# Altium PCB PCB2.pcbdoc (part 1 of 3)
Units mil, origin at the board's own origin, x right, y up, seen from the top; angles counter-clockwise.
Board outline 1771.65 x 2755.61 mil, 4 copper layers (Top Layer, Inner1, Inner2, Bottom Layer), stack 62.447 mil thick; 80 components, 88 nets, 409 pads, 183 vias.
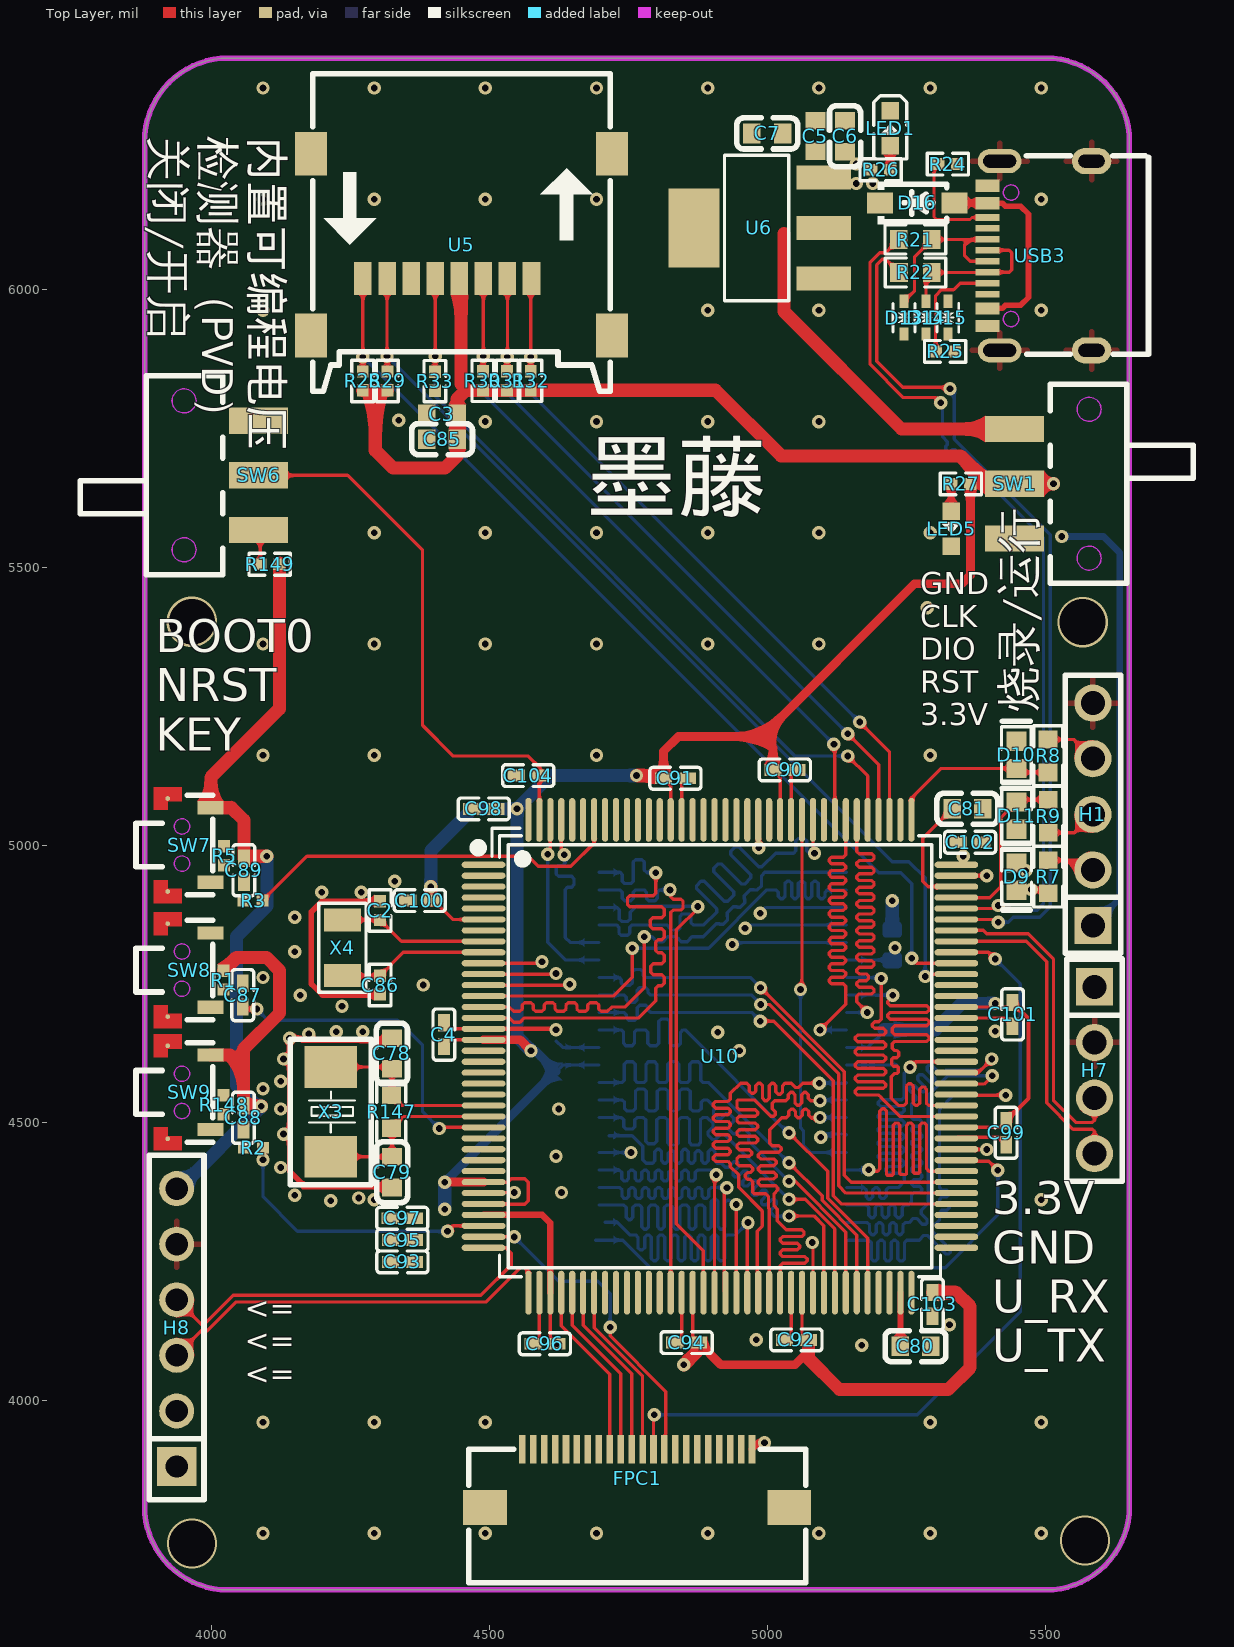
[diagram p0: Top Layer view]
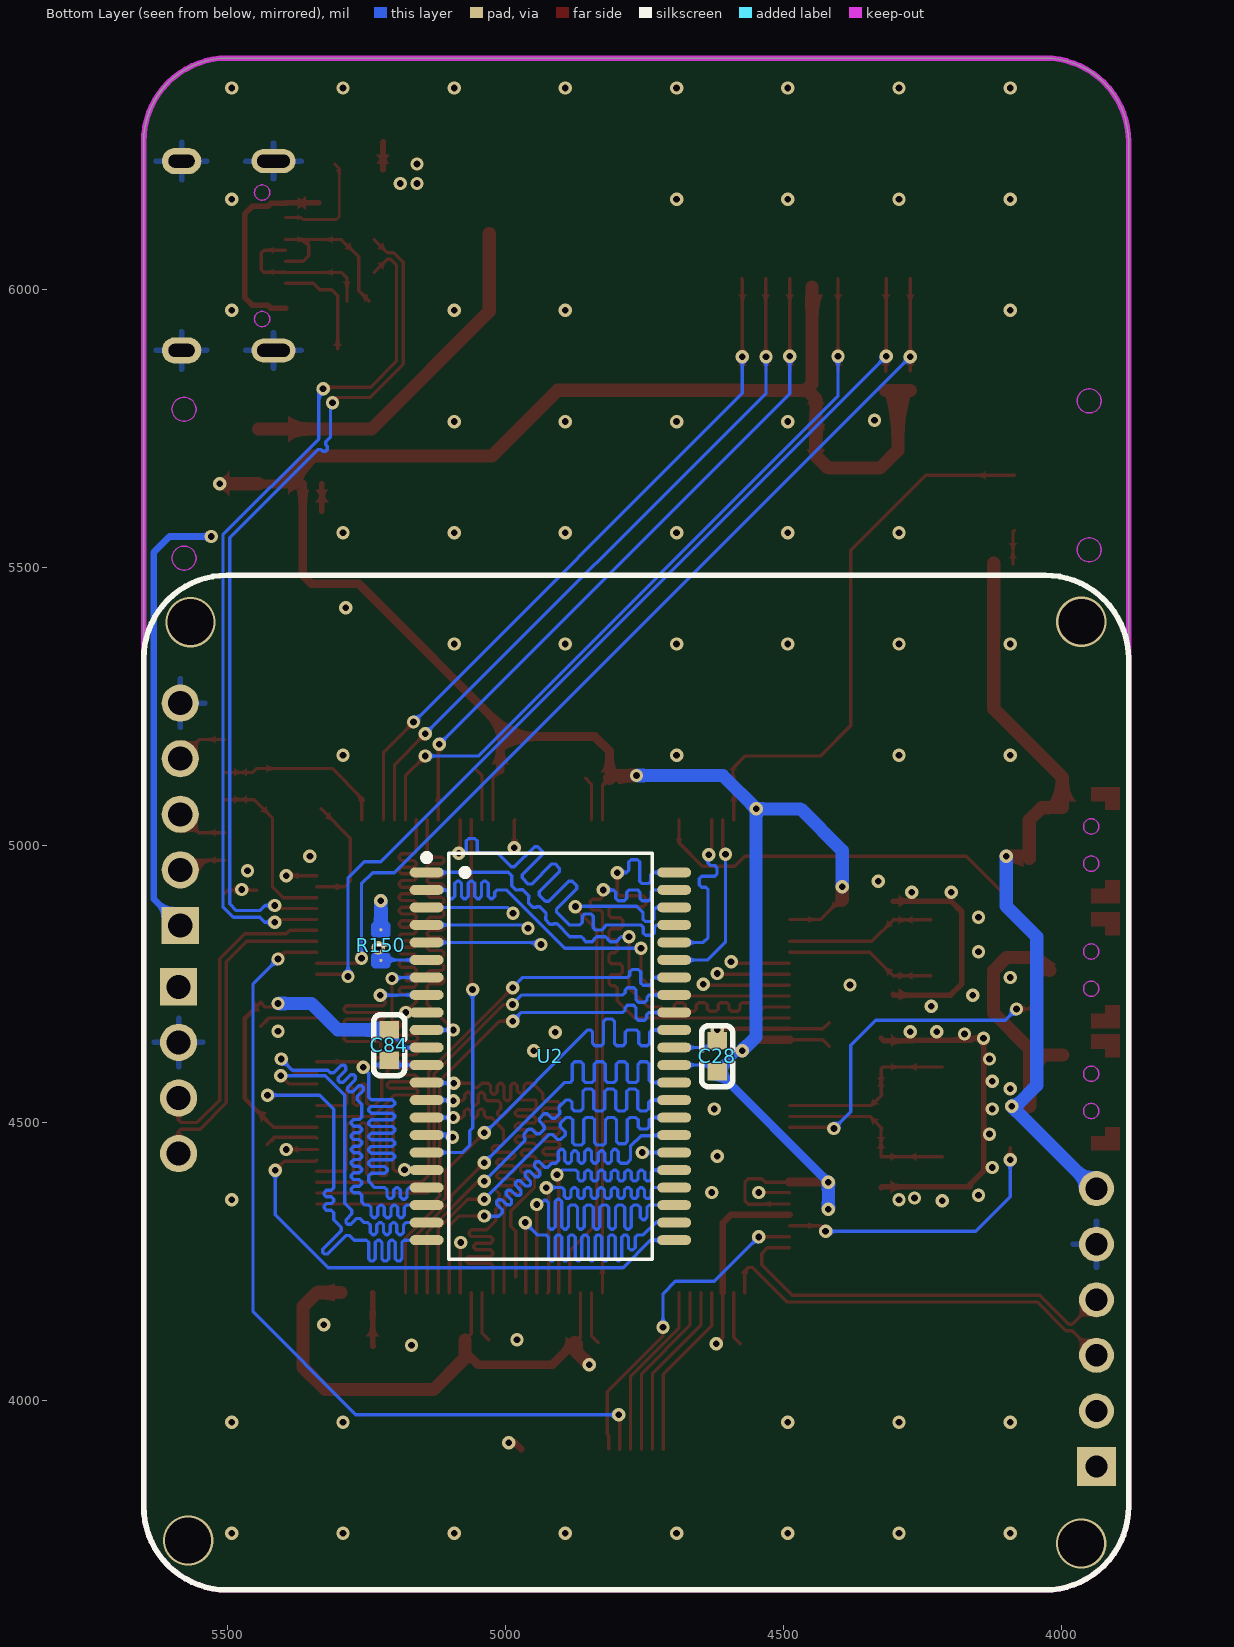
[diagram p1: Bottom Layer view, seen from below]
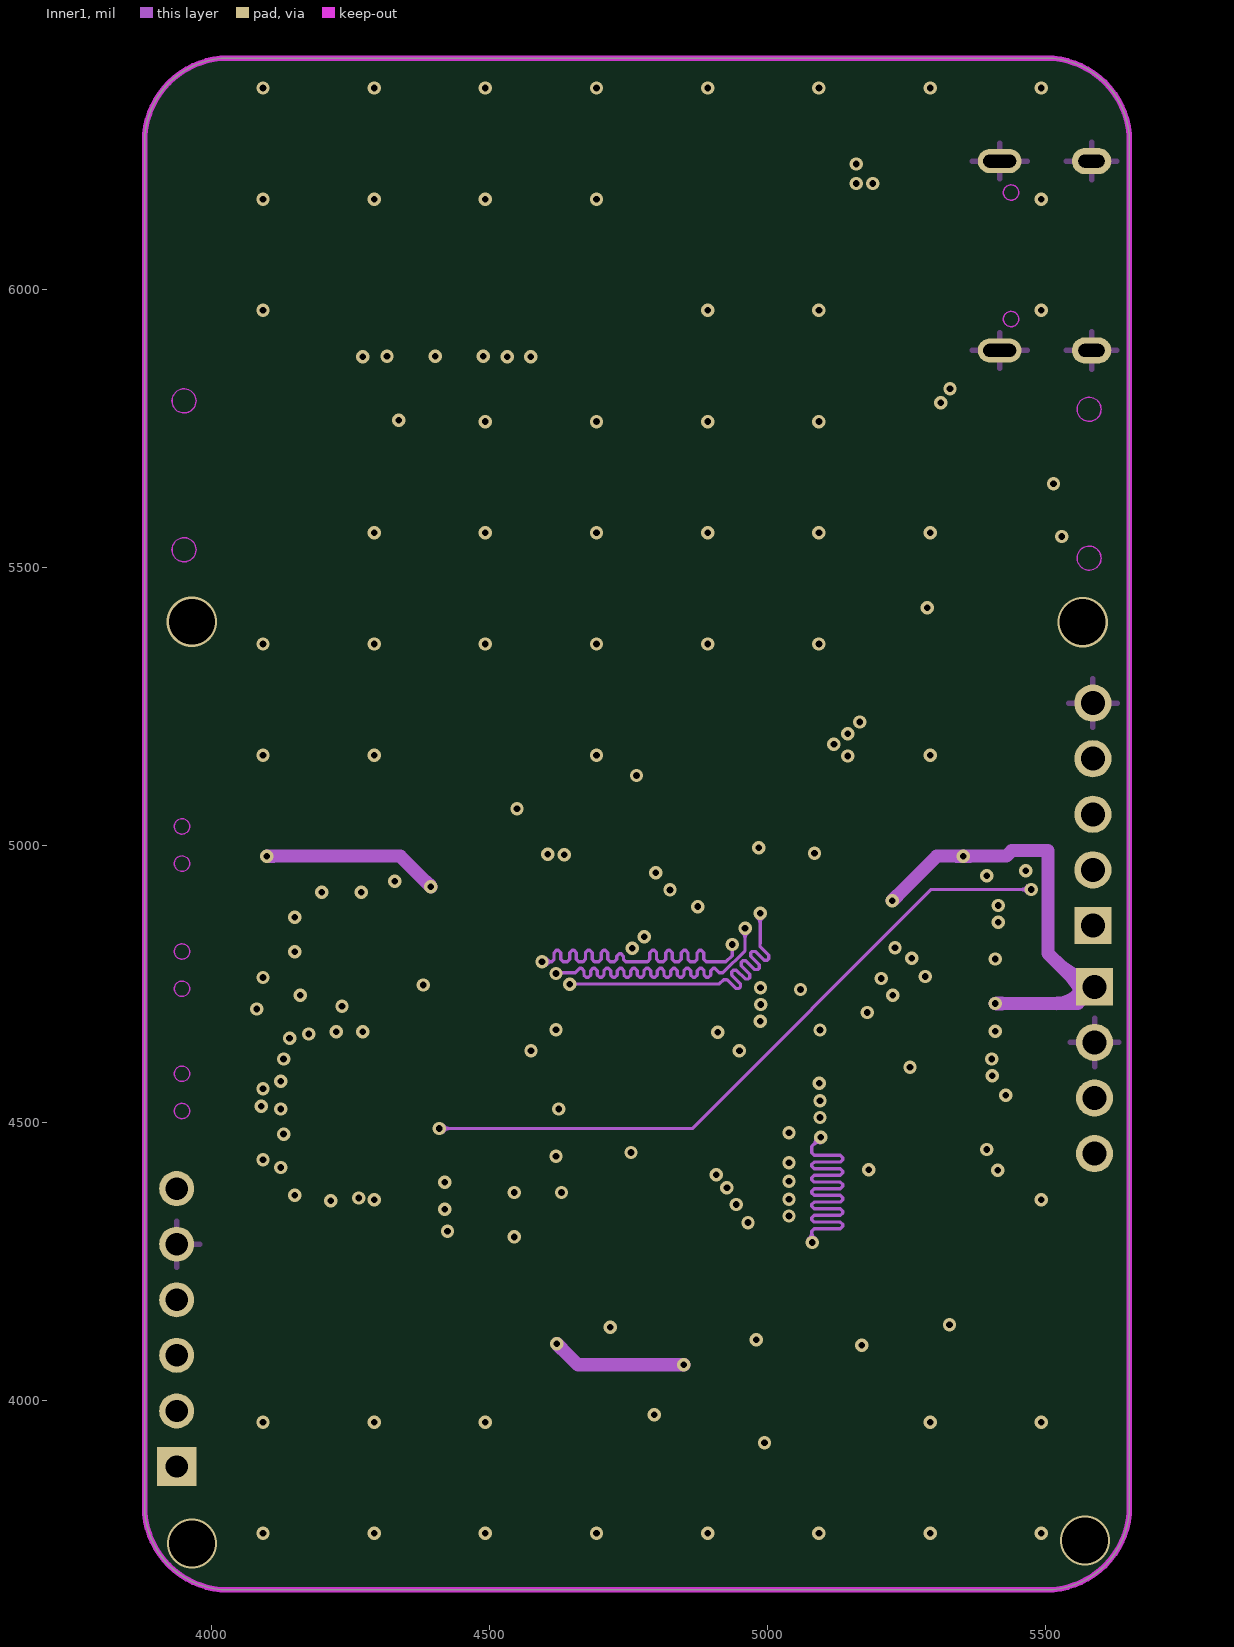
[diagram p2: Inner1]
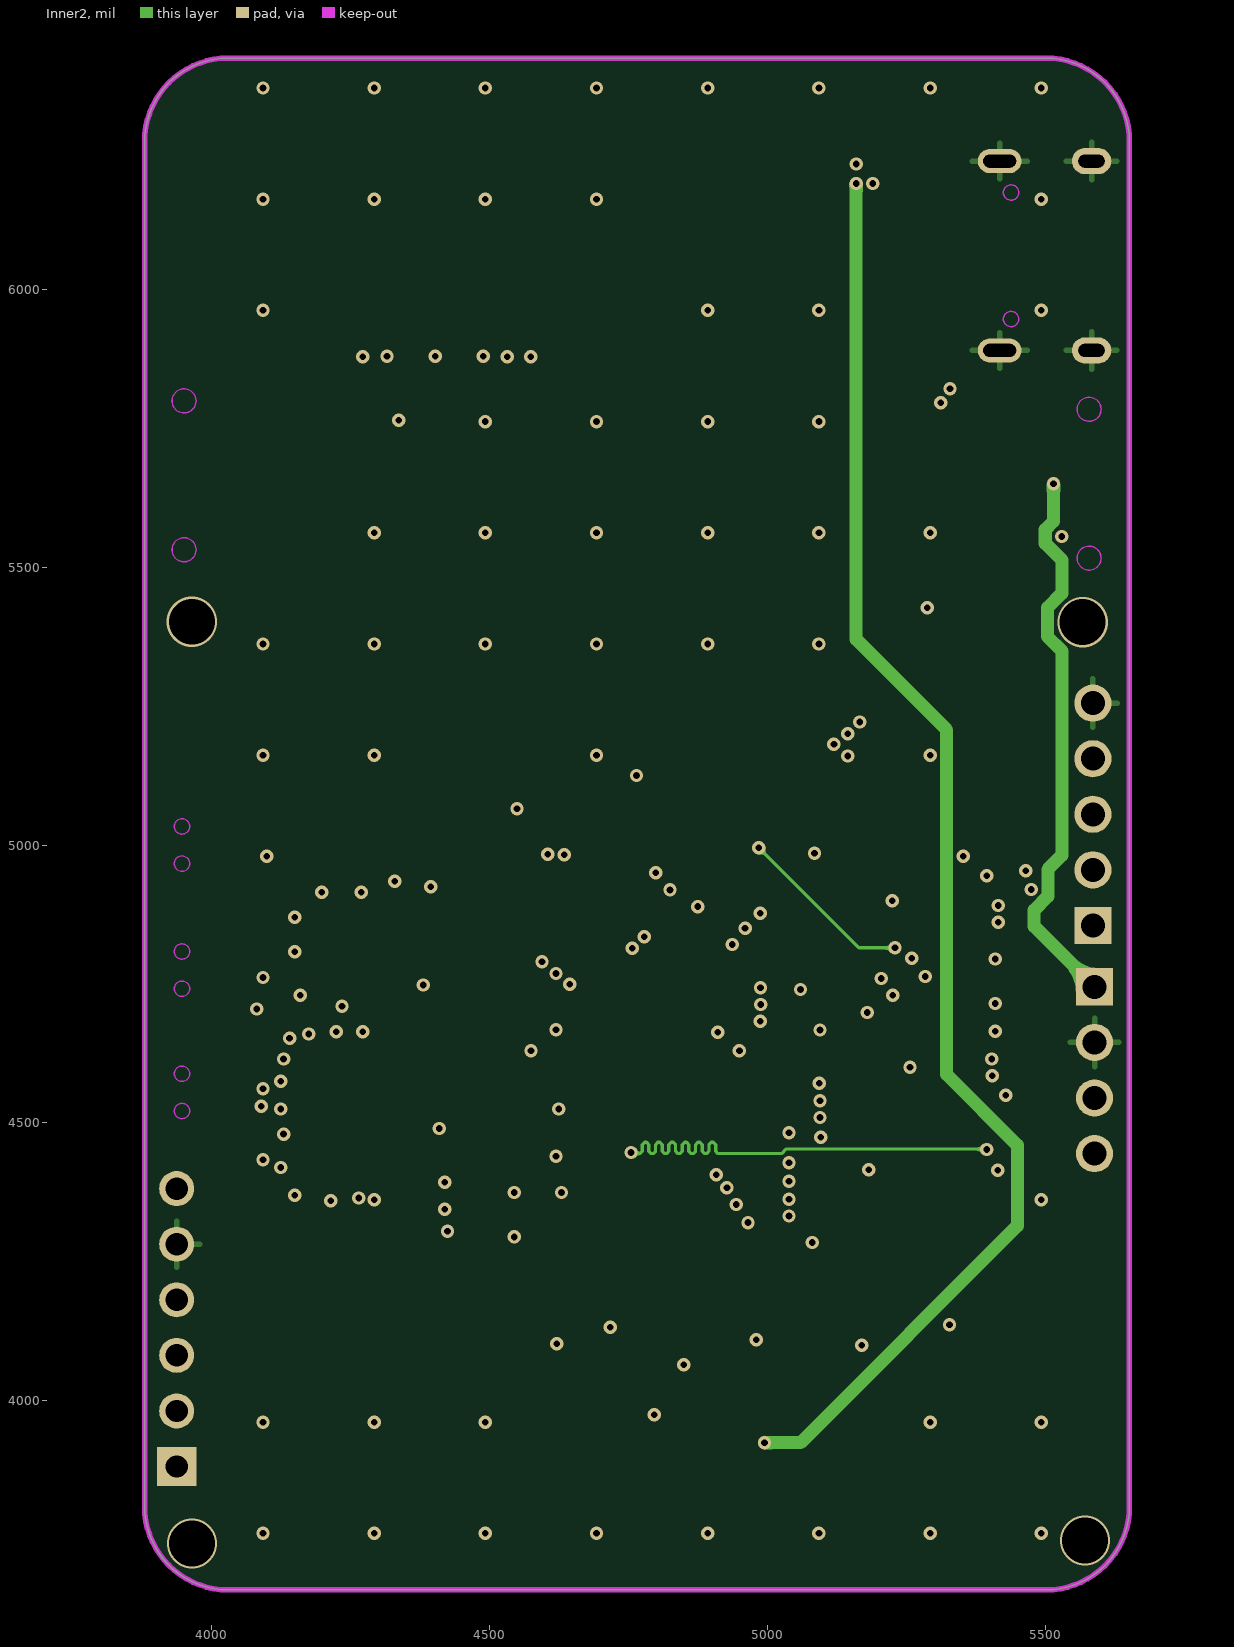
[diagram p3: Inner2]

## Layer stack, top to bottom
Top Layer: signal copper 1.378
Dielectric1: surface 8.283, 7628 RC49% 8.6mil, Dk 0
Inner1: signal copper 0.598
Dielectric2: surface 41.929, 1.1mm H/HOZ Copper, Dk 0
Inner2: signal copper 0.598
Dielectric3: surface 8.283, 7628 RC49% 8.6mil, Dk 0
Bottom Layer: signal copper 1.378

## Board outline
4030,3660 5501.65,3660 ccw(c5501.65,3810) 5651.65,3810 5651.65,6265.61 ccw(c5501.65,6265.61) 5501.65,6415.61 4030,6415.61 ccw(c4030,6265.61) 3880,6265.61 3880,3810 ccw(c4030,3810)

## Design rules (kind name [scope] priority, off if disabled: settings)
BoardOutlineClearance copperThickness1oz [All] p0: genericclearance=10 ignorepadtopadclearanceinfootprint=FALSE except(0: Arc-SplitContinuation Track-SplitContinuation SMDPad-SplitContinuation THPad-SplitContinuation Via-SplitContinuation Fill-SplitContinuation Poly-SplitContinuation Region-SplitContinuation Text-SplitContinuation)
BoardOutlineClearance copperThickness2oz [All] p0: genericclearance=10 ignorepadtopadclearanceinfootprint=FALSE except(0: Arc-SplitContinuation Track-SplitContinuation SMDPad-SplitContinuation THPad-SplitContinuation Via-SplitContinuation Fill-SplitContinuation Poly-SplitContinuation Region-SplitContinuation Text-SplitContinuation)
BoardOutlineClearance Plane_innerPlane [All] p0: genericclearance=10 ignorepadtopadclearanceinfootprint=FALSE except(0: Arc-SplitContinuation Track-SplitContinuation SMDPad-SplitContinuation THPad-SplitContinuation Via-SplitContinuation Fill-SplitContinuation Poly-SplitContinuation Region-SplitContinuation Text-SplitContinuation)
BoardOutlineClearance Copper_copperRegion [All] p0: genericclearance=10 ignorepadtopadclearanceinfootprint=FALSE except(0: Arc-SplitContinuation Track-SplitContinuation SMDPad-SplitContinuation THPad-SplitContinuation Via-SplitContinuation Fill-SplitContinuation Poly-SplitContinuation Region-SplitContinuation Text-SplitContinuation)
BoardOutlineClearance otherClearance [All] p0: genericclearance=10 ignorepadtopadclearanceinfootprint=FALSE except(0: Arc-SplitContinuation Track-SplitContinuation SMDPad-SplitContinuation THPad-SplitContinuation Via-SplitContinuation Fill-SplitContinuation Poly-SplitContinuation Region-SplitContinuation Text-SplitContinuation)
Clearance copperThickness1oz [All] p1: gap=7 ignorepadtopadclearanceinfootprint=FALSE
Clearance copperThickness2oz [All] p1: gap=7 ignorepadtopadclearanceinfootprint=FALSE
Clearance Plane_innerPlane [All] p1: gap=7 ignorepadtopadclearanceinfootprint=FALSE
Clearance Copper_copperRegion [All] p1: gap=7 ignorepadtopadclearanceinfootprint=FALSE
Clearance otherClearance [All] p1: gap=7 ignorepadtopadclearanceinfootprint=FALSE
DiffPairsRouting differentialPair [All] p1: maxuncoupledlength=10 minlimit=6 maxlimit=Infinity mostfreqgap=6 toplayer_minwidth=5 toplayer_prefwidth=10 toplayer_maxwidth=100 bottomlayer_minwidth=5 bottomlayer_prefwidth=10 bottomlayer_maxwidth=100 midlayer1_minwidth=5 midlayer1_prefwidth=10 midlayer1_maxwidth=100 midlayer2_minwidth=5 midlayer2_prefwidth=10 midlayer2_maxwidth=100
PasteMaskExpansion pasteMaskExpansion [All] p1: expansion=0
PlaneConnect innerPlane [All] p1: planeconnectstyle=Relief reliefexpansion=20 reliefentries=4 reliefconductorwidth=10 reliefairgap=10
PolygonConnect copperRegion [All] p1: connectstyle=Relief reliefentries=4 reliefconductorwidth=10 polygonreliefangle="90 Angle" airgapwidth=10
RoutingVias viaSize [All] p1: viastyle="Through Hole" holewidth=12.0078 minholewidth=11.811 maxholewidth=248.0314 width=12.0078 minwidth=11.811 maxwidth=248.0314
SolderMaskExpansion solderMaskExpansion [All] p1: useseparateexpansions=TRUE expansion=2 expansionbottom=2
Width copperThickness1oz [All] p1: maxlimit=100 minlimit=5 preferedwidth=10
Width copperThickness2oz [All] p1: maxlimit=100 minlimit=8 preferedwidth=10

## Components (designator, comment, footprint, x,y, rotation, side; value= is the part's Value field where it differs from the comment)
C2 "" C0402#1 4303.59,4882.12 r270 top
C3 "" C0603 4414.88,5775 r0 top
C4 "" C0402#2 4418.54,4659.04 r270 top
C5 "" C0603 5086.74,6275.27 r270 top
C6 "" C0603 5140,6275 r270 top
C7 "" C0603 5000,6280 r0 top
C28 "" C0603 4620,4620 r90 bottom
C78 "" C0603 4325,4625 r270 top
C79 "" C0603 4325.2,4411.45 r90 top
C80 "" C0603 5266.68,4098.42 r0 top
C81 "" C0603 5360,5065 r0 top
C84 "" C0603 5210,4640 r270 bottom
C85 "" C0603 4415.12,5730 r0 top
C86 "" C0402#1 4303.65,4748.1 r90 top
C87 "" C0402#2 4056.63,4729.95 r270 top
C88 "" C0402#2 4057.66,4509.25 r270 top
C89 "" C0402#2 4058.6,4954.65 r270 top
C90 "" C0402#2 5031.73,5135 r0 top
C91 "" C0402#2 4835,5120 r0 top
C92 "" C0402#2 5052.51,4109.69 r180 top
C93 "" C0402#2 4343.88,4250.12 r180 top
C94 "" C0402#2 4855,4105 r180 top
C95 "" C0402#2 4343.73,4289.34 r180 top
C96 "" C0402#2 4600.16,4102.72 r180 top
C97 "" C0402#2 4343.54,4328.54 r180 top
C98 "" C0402#2 4490,5065 r180 top
C99 "" C0402#2 5429.86,4482.51 r270 top
C100 "" C0402#2 4375,4900 r180 top
C101 "" C0402#2 5441.34,4695.32 r270 top
C102 "" C0402#2 5365,5005 r0 top
C103 "" C0402#2 5297.11,4173.48 r270 top
C104 "" C0402#2 4570,5125 r0 top
D9 "" D0603-BI 5448.5,4943.08 r90 top
D10 "" D0603-BI 5448.3,5162.25 r90 top
D11 "" D0603-BI 5448.63,5052.77 r270 top
D13 "" SOD-523_L1.2-W0.8-LS1.6-BI 5246.2,5948.73 r90 top
D14 "" SOD-523_L1.2-W0.8-LS1.6-BI 5285.77,5948.78 r90 top
D15 "" SOD-523_L1.2-W0.8-LS1.6-BI 5325.02,5948.71 r90 top
D16 "" SOD-123_L2.7-W1.6-LS3.7-RD-1 5270,6155 r0 top
FPC1 "" FPC-SMD_P0.5-22P_FGS-XJ-H2.0 4765.88,3860.62 r180 top
H1 "" HDR-TH_5P-P2.54-V-M 5585.85,5055.26 r90 top
H7 "" HDR-TH_4P-P2.54-V-M 5588.85,4594.91 r270 top
H8 "" HDR-TH_6P-P2.54-V-F 3937.62,4131.93 r90 top
LED1 "" LED0603-RD 5221.17,6288.98 r270 top
LED5 "" LED0603-RD-YELLOW 5331.1,5569.32 r90 top
R1 "" R0402 4021.66,4757.07 r270 top
R2 "" R0402 4075.83,4455.47 r180 top
R3 "" R0402 4075,4900 r180 top
R5 "" R0402 4023.07,4980.87 r90 top
R7 "" R0603#1 5505.62,4943.01 r270 top
R8 "" R0603#1 5505.48,5160.22 r270 top
R9 "" R0603#1 5505.63,5051.96 r90 top
R21 "" R0603#1 5266.49,6089.25 r0 top
R22 "" R0603#1 5266.64,6029.96 r0 top
R24 "" R0402 5325,6225 r0 top
R25 "" R0402 5320.04,5887.86 r0 top
R26 "" R0402 5204.13,6214.77 r180 top
R27 "" R0402 5348.45,5649.57 r0 top
R28 "" R0402 4272.47,5834.86 r270 top
R29 "" R0402 4316.8,5834.81 r270 top
R30 "" R0402 4488.59,5835 r270 top
R31 "" R0402 4532.15,5835.11 r270 top
R32 "" R0402 4574.52,5835.02 r270 top
R33 "" R0402 4402.2,5834.53 r270 top
R147 "" R0603#1 4323.87,4520.27 r90 top
R148 "" R0402 4022.04,4532.96 r90 top
R149 "" R0402 4105,5505 r0 top
R150 "" R0603#2 5225,4820 r270 bottom
SW1 "" SW-SMD_K3-1280S-K1 5445,5650 r0 top
SW6 "" SW-SMD_K3-1280S-K1 4085,5665 r180 top
SW7 "" SW-SMD_2P-TS24CA 3960,5000 r90 top
SW8 "" SW-SMD_2P-TS24CA 3960,4775 r90 top
SW9 "" SW-SMD_2P-TS24CA 3960,4555 r90 top
U2 "" TSOP-44_L18.4-W10.2-P0.80-LS11.8-BL 4920,4620 r270 bottom locked
U5 "" TF-SMD_ZX-TF-281.6J 4450,6080 r0 top
U6 "" SOT-223-3_L6.5-W3.4-P2.30-LS7.0-BR 4985,6110 r0 top
U10 "" LQFP-144_L20.0-W20.0-P0.50-LS22.0-BL 4915,4620 r270 top locked
USB3 "" USB-C-SMD_TYPE-C-6PIN-2MD-073 5490,6060 r90 top
X3 "" OSC-SMD_L5.0-W3.2 4215,4520 r90 top
X4 "" crystal-smd_l3.2-w1.5-1 4235.74,4815.13 r270 top

## Footprints (in the part's own frame and the unit in brackets; to place one, negate y for a bottom-side part, rotate by r counter-clockwise, add the part's x,y. Pads: shape width x height; smd on the part's side, far side on the other; paste and mask are expansions set on the pad)
C0402#1 [mm]
  rect 0.566x0.54 smd: 1(-0.433,0) 2(0.433,0)
  silkscreen extent -0.94,-0.5 0.94,0.5
C0402#2 [mm]
  rect 0.79x0.54 smd: 1(-0.545,0) 2(0.545,0)
  silkscreen extent -1.17,-0.5 1.17,0.5
C0603 [mm]
  rect 0.8x0.9 smd: 1(-0.7,0) 2(0.7,0)
crystal-smd_l3.2-w1.5-1 [mil]
  rect 41.3x66.9 smd: 1(-50.2,0) 2(50.2,0)
  silkscreen extent -80,-43 80,43
D0603-BI [mil]
  rect 34.38x35.72 smd: 1(-24.47,0) 2(24.47,0)
  silkscreen extent -60,-27 60,27
FPC-SMD_P0.5-22P_FGS-XJ-H2.0 [mm]
  rect 0.3x1.3 smd: 1(-5.252,-1.338) 2(-4.752,-1.338) 3(-4.252,-1.338) 4(-3.752,-1.338) 5(-3.252,-1.338) 6(-2.752,-1.338) 7(-2.252,-1.338) 8(-1.752,-1.338) 9(-1.25,-1.339) 10(-0.752,-1.338) 11(-0.252,-1.338) 12(0.248,-1.338) 13(0.748,-1.338) 14(1.248,-1.338) 15(1.748,-1.338) 16(2.248,-1.338) 17(2.748,-1.338) 18(3.248,-1.338) 19(3.748,-1.338) 20(4.25,-1.339) 21(4.748,-1.338) 22(5.248,-1.338)
  rect 2x1.6 smd: 23(6.95,1.339) 24(-6.95,1.339)
  silkscreen extent -7.7,-1.34 7.7,4.76
HDR-TH_4P-P2.54-V-M [mm]
  rect 1.7x1.7 hole 1.1: 1(-3.81,0)
  round 1.7 hole 1.1: 2(-1.27,0) 3(1.27,0) 4(3.81,0)
  silkscreen extent -5.08,-1.27 5.08,1.27
HDR-TH_5P-P2.54-V-M [mm]
  rect 1.7x1.7 hole 1.1: 1(-5.08,0)
  round 1.7 hole 1.1: 2(-2.54,0) 3(0,0) 4(2.54,0) 5(5.08,0)
  silkscreen extent -6.35,-1.27 6.35,1.27
HDR-TH_6P-P2.54-V-F [mm]
  rect 1.8x1.8 hole 1.02: 1(-6.35,0)
  round 1.6 hole 1.02: 2(-3.81,0) 3(-1.27,0) 4(1.27,0) 5(3.81,0) 6(6.35,0)
  silkscreen extent -7.87,-1.25 7.87,1.25
LED0603-RD [mm]
  rect 0.8x0.8 smd: 1(-0.799,0) 2(0.799,0)
  silkscreen extent -1.49,-0.75 1.39,0.76
LED0603-RD-YELLOW [mm]
  rect 0.8x0.8 smd: 1(-0.799,-0.003) 2(0.799,0.003)
  silkscreen extent -0.12,-0.32 0.22,0.36
LQFP-144_L20.0-W20.0-P0.50-LS22.0-BL [mm]
  oval 0.28x2 smd: 1(-8.75,-10.8) 2(-8.25,-10.8) 3(-7.75,-10.8) 4(-7.25,-10.8) 5(-6.75,-10.8) 6(-6.25,-10.8) 7(-5.75,-10.8) 8(-5.25,-10.8) 9(-4.75,-10.8) 10(-4.25,-10.8) 11(-3.75,-10.8) 12(-3.25,-10.8) 13(-2.75,-10.8) 14(-2.25,-10.8) 15(-1.75,-10.8) 16(-1.25,-10.8) 17(-0.75,-10.8) 18(-0.25,-10.8) 19(0.25,-10.8) 20(0.75,-10.8) 21(1.25,-10.8) 22(1.75,-10.8) 23(2.25,-10.8) 24(2.75,-10.8) 25(3.25,-10.8) 26(3.75,-10.8) 27(4.25,-10.8) 28(4.75,-10.8) 29(5.25,-10.8) 30(5.75,-10.8) 31(6.25,-10.8) 32(6.75,-10.8) 33(7.25,-10.8) 34(7.75,-10.8) 35(8.25,-10.8) 36(8.75,-10.8) 73(8.75,10.8) 74(8.25,10.8) 75(7.75,10.8) 76(7.25,10.8) 77(6.75,10.8) 78(6.25,10.8) 79(5.75,10.8) 80(5.25,10.8) 81(4.75,10.8) 82(4.25,10.8) 83(3.75,10.8) 84(3.25,10.8) 85(2.75,10.8) 86(2.25,10.8) 87(1.75,10.8) 88(1.25,10.8) 89(0.75,10.8) 90(0.25,10.8) 91(-0.25,10.8) 92(-0.75,10.8) 93(-1.25,10.8) 94(-1.75,10.8) 95(-2.25,10.8) 96(-2.75,10.8) 97(-3.25,10.8) 98(-3.75,10.8) 99(-4.25,10.8) 100(-4.75,10.8) 101(-5.25,10.8) 102(-5.75,10.8) 103(-6.25,10.8) 104(-6.75,10.8) 105(-7.25,10.8) 106(-7.75,10.8) 107(-8.25,10.8) 108(-8.75,10.8)
  oval 2x0.28 smd: 37(10.8,-8.75) 38(10.8,-8.25) 39(10.8,-7.75) 40(10.8,-7.25) 41(10.8,-6.75) 42(10.8,-6.25) 43(10.8,-5.75) 44(10.8,-5.25) 45(10.8,-4.75) 46(10.8,-4.25) 47(10.8,-3.75) 48(10.8,-3.25) 49(10.8,-2.75) 50(10.8,-2.25) 51(10.8,-1.75) 52(10.8,-1.25) 53(10.8,-0.75) 54(10.8,-0.25) 55(10.8,0.25) 56(10.8,0.75) 57(10.8,1.25) 58(10.8,1.75) 59(10.8,2.25) 60(10.8,2.75) 61(10.8,3.25) 62(10.8,3.75) 63(10.8,4.25) 64(10.8,4.75) 65(10.8,5.25) 66(10.8,5.75) 67(10.8,6.25) 68(10.8,6.75) 69(10.8,7.25) 70(10.8,7.75) 71(10.8,8.25) 72(10.8,8.75) 109(-10.8,8.75) 110(-10.8,8.25) 111(-10.8,7.75) 112(-10.8,7.25) 113(-10.8,6.75) 114(-10.8,6.25) 115(-10.8,5.75) 116(-10.8,5.25) 117(-10.8,4.75) 118(-10.8,4.25) 119(-10.8,3.75) 120(-10.8,3.25) 121(-10.8,2.75) 122(-10.8,2.25) 123(-10.8,1.75) 124(-10.8,1.25) 125(-10.8,0.75) 126(-10.8,0.25) 127(-10.8,-0.25) 128(-10.8,-0.75) 129(-10.8,-1.25) 130(-10.8,-1.75) 131(-10.8,-2.25) 132(-10.8,-2.75) 133(-10.8,-3.25) 134(-10.8,-3.75) 135(-10.8,-4.25) 136(-10.8,-4.75) 137(-10.8,-5.25) 138(-10.8,-5.75) 139(-10.8,-6.25) 140(-10.8,-6.75) 141(-10.8,-7.25) 142(-10.8,-7.75) 143(-10.8,-8.25) 144(-10.8,-8.75)
  silkscreen extent -10.41,-11.25 10.08,10.08
OSC-SMD_L5.0-W3.2 [mm]
  rect 1.9x2.4 smd: 1(-2.05,0) 2(2.05,0)
  silkscreen extent -3.32,-1.85 3.33,1.85
R0402 [mm]
  rect 0.566x0.54 smd: 1(-0.433,0) 2(0.433,0)
R0603#1 [mil]
  rect 31.75x34.02 smd: 1(-29.66,0) 2(29.66,0)
  silkscreen extent -55,-26 55,26
R0603#2 [mil]
  round 5.51 smd: 1(-27.56,0) 2(27.56,0)
  Top Layer region: -35.43,16.93 -19.69,16.93 -18.97,16.89 -18.27,16.75 -17.59,16.54 -16.94,16.25 -16.33,15.88 -15.77,15.44 -15.27,14.94 -14.83,14.38 -14.46,13.77 -14.16,13.12 -13.95,12.44 -13.82,11.73 -13.78,11.02 -13.78,-11.03 -13.82,-11.74 -13.95,-12.44 -14.16,-13.12 -14.46,-13.77 -14.83,-14.38 -15.27,-14.94 -15.77,-15.45 -16.33,-15.88 -16.94,-16.25 -17.59,-16.55 -18.27,-16.76 -18.97,-16.89 -19.69,-16.93 -35.43,-16.93 -36.15,-16.89 -36.85,-16.76 -37.53,-16.55 -38.18,-16.25 -38.79,-15.88 -39.35,-15.45 -39.86,-14.94 -40.29,-14.38 -40.66,-13.77 -40.96,-13.12 -41.17,-12.44 -41.3,-11.74 -41.34,-11.02 -41.34,11.02 -41.3,11.73 -41.17,12.43 -40.96,13.11 -40.66,13.77 -40.29,14.38 -39.86,14.94 -39.35,15.44 -38.79,15.88 -38.18,16.25 -37.53,16.54 -36.85,16.75 -36.15,16.89
  Top Layer region: 19.68,16.93 35.43,16.93 36.14,16.88 36.85,16.75 37.53,16.54 38.18,16.25 38.79,15.88 39.35,15.44 39.85,14.93 40.29,14.37 40.66,13.77 40.95,13.11 41.17,12.43 41.29,11.73 41.34,11.02 41.34,-11.03 41.29,-11.74 41.17,-12.44 40.95,-13.12 40.66,-13.77 40.29,-14.38 39.85,-14.94 39.35,-15.45 38.79,-15.89 38.18,-16.26 37.53,-16.55 36.85,-16.76 36.14,-16.89 35.43,-16.93 19.68,-16.93 18.97,-16.89 18.27,-16.76 17.59,-16.55 16.94,-16.26 16.33,-15.89 15.77,-15.45 15.26,-14.94 14.82,-14.38 14.45,-13.77 14.16,-13.12 13.95,-12.44 13.82,-11.74 13.78,-11.03 13.78,11.02 13.82,11.73 13.95,12.43 14.16,13.11 14.45,13.77 14.82,14.37 15.26,14.93 15.77,15.44 16.33,15.88 16.94,16.25 17.59,16.54 18.27,16.75 18.97,16.88
  silkscreen extent 0,-12 0,12
SOD-123_L2.7-W1.6-LS3.7-RD-1 [mm]
  rect 1.2x0.95 smd: 1(-1.7,0) 2(1.7,0)
  silkscreen extent -1.81,-0.98 1.35,0.98
SOD-523_L1.2-W0.8-LS1.6-BI [mm]
  rect 0.6x0.4 smd: 1(-0.75,0) 2(0.75,0)
  silkscreen extent -0.65,-0.5 0.65,0.5
SOT-223-3_L6.5-W3.4-P2.30-LS7.0-BR [mm]
  rect 2.5x1.1 smd: 1(2.97,-2.3) 2(2.97,0) 3(2.97,2.3)
  rect 2.34x3.6 smd: 4(-2.97,0)
  silkscreen extent -1.57,-3.33 1.37,3.33
SW-SMD_2P-TS24CA [mm]
  rect 0.6x1.2 smd: 1(-1.7,-0.975) 2(1.7,-0.975)
  round 0.21 smd: 3(2.125,0.975) 4(-2.125,0.975)
  Top Layer region: -1.6,0.975 -1.6,1.625 -2.65,1.625 -2.65,0.325 -2,0.325 -2,0.975 -1.6,0.975
  Top Layer region: 2.65,0.325 2.65,1.625 1.6,1.625 1.6,0.975 1.6,0.975 2,0.975 2,0.325
  Board Outline Layer circle w0.003: c0.85,0.325 r0.35
  Board Outline Layer circle w0.003: c-0.85,0.325 r0.35
  Board Outline Layer region: 0.85,-0.025 0.698,0.01 0.576,0.107 0.509,0.247 0.509,0.403 0.576,0.543 0.698,0.64 0.85,0.675 0.85,0.675 1.002,0.64 1.124,0.543 1.191,0.403 1.191,0.247 1.124,0.107 1.002,0.01 0.85,-0.025
  Board Outline Layer region: 0.85,-0.025 0.698,0.01 0.576,0.107 0.509,0.247 0.509,0.403 0.576,0.543 0.698,0.64 0.85,0.675 0.85,0.675 1.002,0.64 1.124,0.543 1.191,0.403 1.191,0.247 1.124,0.107 1.002,0.01 0.85,-0.025
  Board Outline Layer region: -0.85,-0.025 -1.002,0.01 -1.124,0.107 -1.191,0.247 -1.191,0.403 -1.124,0.543 -1.002,0.64 -0.85,0.675 -0.85,0.675 -0.698,0.64 -0.576,0.543 -0.509,0.403 -0.509,0.247 -0.576,0.107 -0.698,0.01 -0.85,-0.025
  Board Outline Layer region: -0.85,-0.025 -1.002,0.01 -1.124,0.107 -1.191,0.247 -1.191,0.403 -1.124,0.543 -1.002,0.64 -0.85,0.675 -0.85,0.675 -0.698,0.64 -0.576,0.543 -0.509,0.403 -0.509,0.247 -0.576,0.107 -0.698,0.01 -0.85,-0.025
  silkscreen extent -2.28,-1.07 2.28,2.43
SW-SMD_K3-1280S-K1 [mm]
  rect 2.7x1.2 smd: 1(0,2.5) 2(0,0) 3(0,-2.5)
  Board Outline Layer circle w0.003: c3.406,3.4 r0.55
  Board Outline Layer circle w0.003: c3.406,-3.4 r0.55
  Board Outline Layer region: 3.956,3.4 3.902,3.161 3.749,2.97 3.529,2.864 3.284,2.864 3.063,2.97 2.911,3.161 2.856,3.4 2.856,3.4 2.911,3.639 3.063,3.83 3.284,3.936 3.529,3.936 3.749,3.83 3.902,3.639 3.956,3.4
  Board Outline Layer region: 3.956,3.4 3.902,3.161 3.749,2.97 3.529,2.864 3.284,2.864 3.063,2.97 2.911,3.161 2.856,3.4 2.856,3.4 2.911,3.639 3.063,3.83 3.284,3.936 3.529,3.936 3.749,3.83 3.902,3.639 3.956,3.4
  Board Outline Layer region: 3.956,-3.4 3.902,-3.639 3.749,-3.83 3.529,-3.936 3.284,-3.936 3.063,-3.83 2.911,-3.639 2.856,-3.4 2.856,-3.4 2.911,-3.161 3.063,-2.97 3.284,-2.864 3.529,-2.864 3.749,-2.97 3.902,-3.161 3.956,-3.4
  Board Outline Layer region: 3.956,-3.4 3.902,-3.639 3.749,-3.83 3.529,-3.936 3.284,-3.936 3.063,-3.83 2.911,-3.639 2.856,-3.4 2.856,-3.4 2.911,-3.161 3.063,-2.97 3.284,-2.864 3.529,-2.864 3.749,-2.97 3.902,-3.161 3.956,-3.4
  silkscreen extent 1.63,-4.55 8.15,4.55
TF-SMD_ZX-TF-281.6J [mm]
  rect 0.8x1.5 smd: 1(3.2,-1.55) 2(2.1,-1.55) 3(1,-1.55) 4(-0.1,-1.55) 5(-1.2,-1.55) 6(-2.3,-1.55) 7(-3.4,-1.55) 8(-4.5,-1.55)
  rect 1.45x2 smd: 9(-6.875,-4.15) 10(6.875,-4.15) 11(6.875,4.15) 12(-6.875,4.15)
  silkscreen extent -6.8,-6.7 6.8,7.8
TSOP-44_L18.4-W10.2-P0.80-LS11.8-BL [mm]
  oval 0.448x1.551 smd: 1(-8.4,-5.656) 2(-7.6,-5.656) 3(-6.8,-5.656) 4(-6,-5.656) 5(-5.2,-5.656) 6(-4.4,-5.656) 7(-3.6,-5.656) 8(-2.8,-5.656) 9(-2,-5.656) 10(-1.2,-5.656) 11(-0.4,-5.656) 12(0.4,-5.656) 13(1.2,-5.656) 14(2,-5.656) 15(2.8,-5.656) 16(3.6,-5.656) 17(4.4,-5.656) 18(5.2,-5.656) 19(6,-5.656) 20(6.8,-5.656) 21(7.6,-5.656) 22(8.4,-5.656) 23(8.4,5.656) 24(7.6,5.656) 25(6.8,5.656) 26(6,5.656) 27(5.2,5.656) 28(4.4,5.656) 29(3.6,5.656) 30(2.8,5.656) 31(2,5.656) 32(1.2,5.656) 33(0.4,5.656) 34(-0.4,5.656) 35(-1.2,5.656) 36(-2,5.656) 37(-2.8,5.656) 38(-3.6,5.656) 39(-4.4,5.656) 40(-5.2,5.656) 41(-6,5.656) 42(-6.8,5.656) 43(-7.6,5.656) 44(-8.4,5.656)
  silkscreen extent -9.28,-5.81 9.28,4.65
USB-C-SMD_TYPE-C-6PIN-2MD-073 [mm]
  rect 0.55x1.1 smd: 1(-3.2,2.375) 2(-2.4,2.375) 11(2.4,2.375) 12(3.2,2.375)
  rect 0.3x1.1 smd: 3(-1.75,2.375) 4(-1.25,2.375) 5(-0.75,2.375) 6(-0.25,2.375) 7(0.25,2.375) 8(0.75,2.375) 9(1.25,2.375) 10(1.75,2.375)
  oval 1.2x1.8 hole 0.6 slot 1.2 at 90 deg: 13(-4.325,-2.375) 14(4.325,-2.375)
  oval 1.1x2 hole 0.6 slot 1.5 at 90 deg: 13(-4.325,1.825) 14(4.325,1.825)
  Board Outline Layer circle w0.003: c-2.89,1.305 r0.35
  Board Outline Layer circle w0.003: c2.89,1.305 r0.35
  Board Outline Layer region: -2.89,0.955 -3.042,0.99 -3.164,1.087 -3.231,1.227 -3.231,1.383 -3.164,1.523 -3.042,1.62 -2.89,1.655 -2.89,1.655 -2.738,1.62 -2.616,1.523 -2.549,1.383 -2.549,1.227 -2.616,1.087 -2.738,0.99 -2.89,0.955
  Board Outline Layer region: -2.89,0.955 -3.042,0.99 -3.164,1.087 -3.231,1.227 -3.231,1.383 -3.164,1.523 -3.042,1.62 -2.89,1.655 -2.89,1.655 -2.738,1.62 -2.616,1.523 -2.549,1.383 -2.549,1.227 -2.616,1.087 -2.738,0.99 -2.89,0.955
  Board Outline Layer region: 2.89,0.955 2.738,0.99 2.616,1.087 2.549,1.227 2.549,1.383 2.616,1.523 2.738,1.62 2.89,1.655 2.89,1.655 3.042,1.62 3.164,1.523 3.231,1.383 3.231,1.227 3.164,1.087 3.042,0.99 2.89,0.955
  Board Outline Layer region: 2.89,0.955 2.738,0.99 2.616,1.087 2.549,1.227 2.549,1.383 2.616,1.523 2.738,1.62 2.89,1.655 2.89,1.655 3.042,1.62 3.164,1.523 3.231,1.383 3.231,1.227 3.164,1.087 3.042,0.99 2.89,0.955
  silkscreen extent -4.5,-4.97 4.57,0.6

## Via types
v1: diameter 24.02, hole 12.01, Top Layer to Bottom Layer, 179 vias
v2: diameter 90.55, hole 82.68, Top Layer to Bottom Layer, 4 vias

## Nets (pads, with @x,y where several pads share a name; then routed paths per layer and width w, separated by ;. In a path a pad name is that pad's centre, name@x,y a point inside that pad or via, vN(x,y) a via of type N, cw(c..) or ccw(c..) an arc to the next point about the centre after c; other vN are vias at no path point)
3.3V: C3.2 C4.2 C28.1 C84.1 C85.2 C88.1 C89.1 C90.1 C91.1 C92.1 C93.1 C94.1 C95.1 C96.1 C97.1 C98.1 C99.1 C100.1 C101.1 C102.1 C103.1 H7.1 H8.6 R1.1 R27.2 R28.2 R29.2 R30.2 R31.2 R32.2 R149.2 R150.1 SW1.2 SW7.2 SW9.2 U2.11 U2.33 U5.4 U10.6 U10.17 U10.30 U10.32 U10.33 U10.39 U10.52 U10.62 U10.72 U10.84 U10.95 U10.108 U10.121 U10.131 U10.144 | length 11374.2
  Top Layer w6: C100.1@4400,4900 4433.94,4866.06 U10.6@4489.8,4866.06 ; C4.2@4418.54,4637.58 4430.49,4649.53 U10.17@4489.8,4649.53 ; U10.32@4489.8,4354.25 4536.06,4354.25 4536.3,4354.01 4564.01,4354.01 4570,4360 4570,4393.62 4564,4399.62 4539.62,4399.62 4533.62,4393.62 U10.30@4489.8,4393.62 ; U10.39@4609.88,4194.8 4609.88,4114.45 v1(4621.62,4102.72) ; C91.1@4813.54,5120 4826.42,5107.12 U10.131@4826.42,5045.2 ; U10.52@4865.79,4194.8 4865.79,4115.67 C94.1@4876.46,4105 ; C90.1@5010.27,5135 5023.27,5122 U10.121@5023.27,5045.2 ; U10.62@5062.64,4194.8 5062.64,4121.01 C92.1@5073.97,4109.69 ; U10.84@5340.2,4492.05 5417.94,4492.05 C99.1@5429.86,4503.97 ; U10.95@5340.2,4708.58 5433.14,4708.58 C101.1@5441.34,4716.78
  Top Layer w7.87: C99.1@5429.86,4503.97 5470,4544.11 5470,4688.12 C101.1@5441.34,4716.78
  Top Layer w11.81: U10.33@4489.8,4334.57 4595.43,4334.57 4609.88,4320.12 U10.39@4609.88,4194.8
  Top Layer w15.75: v1(4420,4393.62) U10.30@4489.8,4393.62 ; U10.17@4489.8,4649.53 4555.47,4649.53 v1(4575,4630) ; C91.1@4813.54,5120 4813.54,5168.54 4840,5195 4990,5195 ; C94.1@4876.46,4105 4916.46,4065 5050,4065 5073.97,4088.97 ; C90.1@5010.27,5135 5010.27,5174.73 4990,5195 ; SW1.2@5445,5650 5444.57,5649.57 R27.2@5365.49,5649.57 5365.49,5485.75 5349.74,5470 5265,5470 4990,5195
  Top Layer w23.62: SW9.2@3998.39,4621.93 4033.07,4621.93 4057.66,4597.34 ; R1.1@4021.66,4774.11 4045.28,4797.73 4099.21,4797.73 4122.83,4774.11 4122.83,4697.83 4057.66,4632.66 4057.66,4597.34 ; v1(4090,4530) 4058.37,4530 C88.1@4057.66,4530.71 4057.66,4597.34 ; v1(4100,4980) 4062.49,4980 C89.1@4058.6,4976.11 4058.6,5045.02 4036.22,5067.39 3999.22,5067.39 3999.22,5121.66 4122.39,5244.84 4122.39,5348.95 4122.83,5349.38 4122.83,5374.07 4122.39,5374.51 R149.2@4122.39,5506.8 ; R28.2@4272.47,5817.82 R29.2@4316.8,5817.77 ; R29.2@4316.8,5817.77 4295,5817.77 4295,5710 4327.04,5677.96 4420,5677.96 4442.68,5700.64 C85.2@4442.68,5730 4442.44,5730.24 C3.2@4442.44,5775 4442.44,5802.44 4457.96,5817.96 R30.2@4488.59,5817.96 R32.2@4574.52,5817.98 ; v1(4395,4925) 4395,4901.46 C100.1@4396.46,4900 ; U5.4@4449.17,6003.57 4449.17,5829.6 4459.45,5819.32 ; R32.2@4574.52,5817.98 4907.02,5817.98 5025,5700 5347.7,5700 5391.81,5655.88 ; v1(4765,5125) 4808.54,5125 C91.1@4813.54,5120 ; v1(4850,4065) 4873.62,4088.62 4873.62,4102.16 C94.1@4876.46,4105 ; C92.1@5073.97,4109.69 5073.97,4088.97 5073.97,4076.58 5130,4020.54 5325.54,4020.54 5365,4060 5365,4170 5340.06,4194.94 C103.1@5297.11,4194.94 ; SW1.2@5445,5650 v1(5515,5650)
  Inner1 w23.62: v1(4100,4980) 4340,4980 v1(4395,4925) ; v1(4621.62,4102.72) 4659.33,4065 v1(4850,4065) ; v1(5225,4900) 5305,4980 v1(5352.63,4980) 5430,4980 5440,4990 5505,4990 5505,4805 5565.09,4744.91 H7.1@5588.85,4744.91 5558.94,4715 v1(5410,4715)
  Inner2 w23.62: v1(5515,5650) 5515,5582.15 5500.2,5567.34 5500.2,5542.66 5530,5512.85 5530,5452.88 5504.28,5427.16 5504.28,5374.91 5530,5349.19 5530,4981.33 5504.8,4956.13 5504.8,4907.66 5480,4882.85 5480,4853.76 H7.1@5588.85,4744.91
  Bottom Layer w6: C28.1@4620,4592.44 4631.81,4604.25 U2.33@4697.34,4604.25 ; U2.11@5142.66,4635.75 5180.75,4635.75 C84.1@5207.56,4662.56
  Bottom Layer w15.75: v1(4420,4393.62) 4618.82,4592.44 C28.1@4620,4592.44 4582.44,4630 v1(4575,4630)
  Bottom Layer w23.62: H8.6@3937.62,4381.93 3941.93,4381.93 v1(4090,4530) 4088.07,4531.93 4080.68,4531.93 4045,4567.61 4045,4835 4100,4890 v1(4100,4980) ; v1(4395,4925) 4395,4990 4470,5065 v1(4550,5065) ; v1(4420,4345) v1(4420,4393.62) ; v1(4575,4630) 4550,4655 v1(4550,5065) ; v1(4765,5125) 4610,5125 v1(4550,5065) ; C84.1@5210,4667.56 5302.56,4667.56 5350,4715 v1(5410,4715) ; R150.1@5225,4847.56 v1(5225,4900)
5V_USB: C5.2 C6.2 D16.1 FPC1.1 FPC1.2 FPC1.3 FPC1.4 FPC1.5 FPC1.6 FPC1.7 FPC1.8 R26.2 U6.3 | length 2638.9
  Top Layer w11.81: FPC1.1@4972.65,3913.29 4984.36,3925 v1(4995,3925)
  Inner2 w23.62: v1(4995,3925) 5060,3925 5450,4315 5450,4460 5322.83,4587.17 5322.83,5207.17 5160,5370 v1(5160,6190)
  other v1: 5190,6190 5160,6225
$1N4201: D15.2 D16.2 USB3.2 USB3.11 | length 372.9
  Top Layer w10: D16.2@5336.93,6155 5395.99,6155 USB3.11@5396.49,6154.49 5422.89,6154.49 5428.37,6149.02 5455.98,6149.02 5470,6135 5470,5985 5455.99,5970.99 5428.37,5970.99 5422.89,5965.52 USB3.2@5396.49,5965.52
$1N4322: R25.1 USB3.4 | length 199
  Top Layer w6: R25.1@5302.85,5892.37 5302.85,5988.46 5313.42,5999.03 5335.16,5999.03 5346.92,6010.8 USB3.4@5396.49,6010.8
$1N4327: D13.2 R21.2 USB3.6 USB3.8 | length 311.1
  Top Layer w5.98: D13.2@5246.2,5978.25 5265,5997.05 5265,6058.1 R21.2@5296.15,6089.25 5365.19,6089.25 ; USB3.6@5396.49,6050.15 5365,6050.15 5355,6060.15 5355,6079.06 5365.19,6089.25 ; USB3.8@5396.49,6089.52 5396.22,6089.25 5365.19,6089.25
$1N4333: D14.2 R22.2 USB3.5 USB3.7 | length 277.4
  Top Layer w5.98: D14.2@5285.77,5978.3 5285.77,6019.43 R22.2@5296.3,6029.96 5395.98,6029.96 USB3.5@5396.49,6030.48 5435.48,6030.48 5440,6035 5440,6065 5435,6070 5396.65,6070 USB3.7@5396.49,6069.85
$1N4479: R24.1 USB3.10 | length 198.5
  Top Layer w5: R24.1@5307.96,6225 5300,6217.04 5300,6130 5305,6125 5365,6125 5368.9,6128.9 USB3.10@5396.49,6128.9
$1N4593: C7.1 SW1.1 U6.2 U6.4 | length 642.6
  Top Layer w23.62: 5030,6100 5030,5960 5241.58,5748.42 SW1.1@5445,5748.42
$1N4774: H1.1 SW1.3 | length 806.6
  Bottom Layer w11.81: v1(5530,5555) 5605,5555 5633.94,5526.06 5633.94,4903.34 H1.1@5585.85,4855.26
$1N5998: LED1.2 R26.1 | length 43.2
  Top Layer w10: LED1.2@5220.83,6264.77 LED1.2@5221.17,6264.43 ; R26.1@5221.17,6214.77 LED1.2@5221.18,6257.51
$1N6126: LED5.2 R27.1 | length 49
  Top Layer w10: LED5.2@5330.97,5600.79 5330.97,5649.13 R27.1@5331.41,5649.57
$1N20074: C86.2 U10.9 X4.2 | length 271.5
  Top Layer w5.98: X4.2@4235.74,4764.93 4303.43,4764.93 C86.2@4303.65,4765.14 4345.51,4807.01 U10.9@4489.8,4807.01
$1N20111: C2.2 U10.8 X4.1 | length 270.1
  Top Layer w5.98: X4.1@4235.74,4865.33 4303.35,4865.33 C2.2@4303.59,4865.08 4341.98,4826.69 U10.8@4489.8,4826.69
$1N25234: C88.2 R2.2 R148.1 SW9.1
$1N25235: C89.2 R3.2 R5.1 SW7.1
$1N46396: C80.1 U10.71 | length 96.7
  Top Layer w10: C80.1@5239.12,4098.42 5239.8,4099.1 U10.71@5239.8,4194.8
$1N46400: C81.1 U10.106 | length 216.3
  Top Layer w6: C81.1@5332.44,5065 5280,5012.56 5280,4934.69 5289.69,4925 5340.08,4925 U10.106@5340.2,4925.12
$1N46552: C104.2 SW6.2 U10.143 | length 1002.9
  Top Layer w5.98: U10.143@4590.2,5045.2 4590.2,5123.74 C104.2@4591.46,5125
  Top Layer w6: SW6.2@4085,5665 4245,5665 4380,5530 4380,5215 4435,5160 4570,5160 4591.46,5138.54 C104.2@4591.46,5125
$1N46566: R149.1 SW6.1 | length 62.8
  Top Layer w5.98: SW6.1@4085,5566.58 4087.96,5563.62 R149.1@4087.96,5505
A0: U2.5 U10.10 | length 946.2
  Top Layer w6: U10.10@4489.8,4787.32 4592.32,4787.32 v1(4595,4790)
  Inner1 w6: v1(4595,4790) 4612.26,4790 4616.5,4794.24 4616.5,4806.16 4620.75,4810.41 4624.26,4810.41 4628.5,4806.16 4628.5,4794.24 4632.75,4790 4640.5,4790 4644.75,4794.24 4644.75,4806.16 4648.99,4810.41 4652.5,4810.41 4656.75,4806.16 4656.75,4794.24 4660.99,4790 4668.75,4790 4672.99,4794.24 4672.99,4806.16 4677.23,4810.41 4680.75,4810.41 4684.99,4806.16 4684.99,4794.24 4689.23,4790 4696.99,4790 4701.23,4794.24 4701.23,4806.16 4705.47,4810.41 4708.99,4810.41 4713.23,4806.16 4713.23,4794.24 4717.47,4790 4725.23,4790 4729.47,4794.24 4729.47,4800.29 4733.72,4804.53 4737.23,4804.53 4741.47,4800.29 4741.47,4794.24 4745.72,4790 4784.74,4790 4788.98,4794.24 4788.98,4806.16 4793.22,4810.41 4796.74,4810.41 4800.98,4806.16 4800.98,4794.24 4805.22,4790 4812.98,4790 4817.22,4794.24 4817.22,4806.16 4821.47,4810.41 4824.98,4810.41 4829.22,4806.16 4829.22,4794.24 4833.47,4790 4841.22,4790 4845.47,4794.24 4845.47,4806.16 4849.71,4810.41 4853.22,4810.41 4857.47,4806.16 4857.47,4794.24 4861.71,4790 4869.47,4790 4873.71,4794.24 4873.71,4806.16 4877.95,4810.41 4881.47,4810.41 4885.71,4806.16 4885.71,4794.24 4889.95,4790 4925.84,4790 4936.86,4801.03 v1(4936.86,4821.12)
  Bottom Layer w6: v1(4936.86,4821.12) 4940.47,4824.72 U2.5@5142.66,4824.72
A1: U2.4 U10.11 | length 947.5
  Top Layer w6: U10.11@4489.8,4767.64 4618.7,4767.64 v1(4620,4768.94)
  Inner1 w6: v1(4620,4768.94) 4621.31,4770.25 4654.57,4770.25 4662.54,4778.23 4666.06,4778.23 4670.3,4773.98 4670.3,4766.11 4674.54,4761.87 4678.06,4761.87 4682.3,4766.11 4682.3,4773.98 4686.54,4778.23 4690.06,4778.23 4694.3,4773.98 4694.3,4766.11 4698.54,4761.87 4702.06,4761.87 4706.3,4766.11 4706.3,4773.98 4710.54,4778.23 4714.06,4778.23 4718.3,4773.98 4718.3,4766.11 4722.54,4761.87 4726.06,4761.87 4730.3,4766.11 4730.3,4773.98 4734.54,4778.23 4738.06,4778.23 4742.3,4773.98 4742.3,4766.11 4746.54,4761.87 4750.06,4761.87 4754.3,4766.11 4754.3,4773.98 4758.54,4778.23 4762.06,4778.23 4766.3,4773.98 4766.3,4766.11 4770.54,4761.87 4774.06,4761.87 4778.3,4766.11 4778.3,4773.98 4782.54,4778.23 4786.06,4778.23 4790.3,4773.98 4790.3,4766.11 4794.54,4761.87 4798.06,4761.87 4802.3,4766.11 4802.3,4773.98 4806.54,4778.23 4810.06,4778.23 4814.3,4773.98 4814.3,4766.11 4818.54,4761.87 4822.06,4761.87 4826.3,4766.11 4826.3,4773.98 4830.54,4778.23 4834.06,4778.23 4838.3,4773.98 4838.3,4766.11 4842.54,4761.87 4846.06,4761.87 4850.3,4766.11 4850.3,4773.98 4854.54,4778.23 4858.06,4778.23 4862.3,4773.98 4862.3,4766.11 4866.54,4761.87 4870.06,4761.87 4874.3,4766.11 4874.3,4773.98 4878.54,4778.23 4882.06,4778.23 4886.3,4773.98 4886.3,4766.11 4890.54,4761.87 4894.06,4761.87 4898.3,4766.11 4898.3,4773.98 4902.54,4778.23 4906.06,4778.23 4914.03,4770.25 4920.25,4770.25 4960.19,4810.19 v1(4960.19,4850.5)
  Bottom Layer w6: v1(4960.19,4850.5) 4965.91,4856.22 U2.4@5142.66,4856.22
A2: U2.3 U10.12 | length 946.9
  Top Layer w6: U10.12@4489.8,4747.95 4643.72,4747.95 v1(4645.03,4749.26)
  Inner1 w6: v1(4645.03,4749.26) 4645.77,4750 4914.16,4750 4921.76,4757.6 4927.76,4757.6 4943.35,4742.01 4949.35,4742.01 4951.84,4744.5 4951.84,4750.5 4936.25,4766.08 4936.25,4772.08 4938.73,4774.57 4944.73,4774.57 4960.32,4758.98 4966.32,4758.98 4968.81,4761.47 4968.81,4767.47 4953.22,4783.06 4953.22,4789.06 4955.71,4791.54 4961.71,4791.54 4977.29,4775.95 4983.29,4775.95 4985.78,4778.44 4985.78,4784.44 4970.19,4800.03 4970.19,4806.03 4972.68,4808.51 4978.68,4808.51 4994.26,4792.92 5000.26,4792.92 5002.75,4795.41 5002.75,4801.41 4987.16,4817 4987.16,4823 4987.3,4823.13 v1(4987.3,4877.21)
  Bottom Layer w6: v1(4987.3,4877.21) 4997.81,4887.72 U2.3@5142.66,4887.72
A3: U2.2 U10.13 | length 946.4
  Top Layer w6: U10.13@4489.8,4728.27 4723.27,4728.27 4757.06,4762.06 v1(4757.06,4814.4)
  Bottom Layer w6: v1(4757.06,4814.4) 4769.8,4814.4 4769.96,4814.24 4787.35,4814.24 4787.51,4814.4 4894.4,4814.4 4999.21,4919.21 5015.77,4919.21 5020.01,4914.97 5020.01,4907.49 5024.25,4903.25 5027.77,4903.25 5032.01,4907.49 5032.01,4930.93 5036.25,4935.17 5039.77,4935.17 5044.01,4930.93 5044.01,4907.49 5048.25,4903.25 5051.77,4903.25 5056.01,4907.49 5056.01,4930.93 5060.25,4935.17 5063.77,4935.17 5068.01,4930.93 5068.01,4907.49 5072.25,4903.25 5075.77,4903.25 5080.01,4907.49 5080.01,4930.93 5084.25,4935.17 5087.77,4935.17 5092.01,4930.93 5092.01,4907.49 5096.25,4903.25 5099.77,4903.25 5104.01,4907.49 5104.01,4914.97 5108.25,4919.21 U2.2@5142.66,4919.21
A4: U2.1 U10.14 | length 945
  Top Layer w6: U10.14@4489.8,4708.58 4535.99,4708.58 4543.86,4700.71 4555.06,4700.71 4559.31,4704.95 4559.31,4712.21 4563.55,4716.45 4574.75,4716.45 4578.99,4712.21 4578.99,4704.95 4583.23,4700.71 4594.43,4700.71 4598.68,4704.95 4598.68,4712.21 4602.92,4716.45 4614.12,4716.45 4618.36,4712.21 4618.36,4704.95 4622.6,4700.71 4633.8,4700.71 4638.05,4704.95 4638.05,4712.21 4642.29,4716.45 4653.49,4716.45 4657.73,4712.21 4657.73,4704.95 4661.97,4700.71 4673.17,4700.71 4677.42,4704.95 4677.42,4712.21 4681.66,4716.45 4692.86,4716.45 4697.1,4712.21 4697.1,4704.95 4701.34,4700.71 4712.54,4700.71 4720.42,4708.58 4743.58,4708.58 4778.65,4743.65 v1(4778.65,4835.23)
  Bottom Layer w6: v1(4778.65,4835.23) 4792.86,4835.23 4797.1,4830.99 4797.1,4830.41 4801.35,4826.17 4812.55,4826.17 4816.79,4830.41 4816.79,4830.99 4821.03,4835.23 4836.48,4835.23 4840.72,4830.99 4840.72,4830.41 4844.96,4826.17 4856.16,4826.17 4860.4,4830.41 4860.4,4830.99 4864.65,4835.23 4885.23,4835.23 4908.08,4858.08 4914.08,4858.08 4914.75,4857.4 4920.75,4857.4 4928.67,4865.32 4928.67,4871.32 4928,4872 4928,4878 4938.92,4888.92 4944.92,4888.92 4945.59,4888.24 4951.59,4888.24 4959.51,4896.16 4959.51,4902.16 4958.84,4902.84 4958.84,4908.84 4969.76,4919.76 4975.76,4919.76 4976.43,4919.08 4982.43,4919.08 4989.74,4926.39 4989.74,4944.65 4995.79,4950.71 U2.1@5142.66,4950.71
A5: U2.44 U10.15 | length 949.2
  Top Layer w6: U10.15@4489.8,4688.9 4536.22,4688.9 4544.09,4681.03 4555.29,4681.03 4563.17,4688.9 4768.9,4688.9 4799.65,4719.65 4799.65,4742.63 4803.89,4746.87 4810.4,4746.87 4814.65,4751.12 4814.65,4762.32 4810.4,4766.56 4794.67,4766.56 4790.43,4770.8 4790.43,4782 4794.67,4786.24 4810.4,4786.24 4814.65,4790.49 4814.65,4801.69 4810.4,4805.93 4803.89,4805.93 4799.65,4810.17 4799.65,4825.61 4803.89,4829.86 4810.4,4829.86 4814.65,4834.1 4814.65,4845.3 4810.4,4849.54 4794.03,4849.54 4789.78,4853.78 4789.78,4864.98 4794.03,4869.23 4810.4,4869.23 4814.65,4873.47 4814.65,4884.67 4810.4,4888.91 4752.82,4888.91 4748.58,4893.16 4748.58,4904.35 4752.82,4908.6 4795.4,4908.6 4799.65,4912.84 v1(4799.65,4950.35)
  Bottom Layer w6: U2.44@4697.34,4950.71 4735.22,4950.71 4739.47,4946.47 4739.47,4934.87 4743.71,4930.63 4754.91,4930.63 4759.15,4934.87 4759.15,4969.55 4763.4,4973.79 4774.59,4973.79 4778.84,4969.55 4778.84,4954.95 4783.08,4950.71 4799.29,4950.71 v1(4799.65,4950.35)
A6: U2.43 U10.50 | length 944.6
  Top Layer w6: v1(4825,4919.21) 4826.42,4917.79 4826.42,4906.95 4830.66,4902.71 4844.28,4902.71 4848.52,4898.47 4848.52,4887.27 4844.28,4883.03 4830.66,4883.03 4826.42,4878.78 U10.50@4826.42,4194.8
  Bottom Layer w6: U2.43@4697.34,4919.21 4734.94,4919.21 4739.18,4914.97 4739.18,4904.06 4743.42,4899.82 4754.62,4899.82 4758.86,4904.06 4758.86,4914.97 4763.11,4919.21 4778.55,4919.21 4782.79,4914.97 4782.79,4904.06 4787.03,4899.82 4798.23,4899.82 4802.48,4904.06 4802.48,4914.97 4806.72,4919.21 v1(4825,4919.21)
A7: U2.42 U10.53 | length 946.3
  Top Layer w6: v1@4876.48,4887.48 4836.44,4847.43 4836.44,4318.56 4885,4270 4885,4195.27 U10.53@4885.47,4194.8
  Bottom Layer w6: U2.42@4697.34,4887.72 4729.52,4887.72 4733.77,4883.48 4733.77,4866.68 4738.01,4862.44 4749.21,4862.44 4753.45,4866.68 4753.45,4878.87 4764.39,4889.81 4874.47,4889.81 v1(4875.02,4889.26)
A8: U2.27 U10.54 | length 604.4
  Top Layer w6: U10.54@4905.16,4194.8 4905.16,4403.7 v1(4908.07,4406.61)
  Bottom Layer w6: U2.27@4697.34,4415.28 4734.11,4415.28 4738.35,4411.04 4738.35,4399.8 4742.6,4395.55 4746.11,4395.55 4750.35,4399.8 4750.35,4411.04 4754.6,4415.28 4758.11,4415.28 4762.35,4411.04 4762.35,4399.8 4766.6,4395.55 4770.11,4395.55 4774.35,4399.8 4774.35,4411.04 4778.6,4415.28 4782.11,4415.28 4786.35,4411.04 4786.35,4399.8 4790.6,4395.55 4794.11,4395.55 4798.35,4399.8 4798.35,4411.04 4802.6,4415.28 4806.11,4415.28 4810.35,4411.04 4810.35,4399.8 4814.6,4395.55 4818.11,4395.55 4822.35,4399.8 4822.35,4411.04 4826.6,4415.28 4830.11,4415.28 4834.35,4411.04 4834.35,4399.8 4838.6,4395.55 4842.11,4395.55 4846.35,4399.8 4846.35,4411.04 4850.6,4415.28 4854.11,4415.28 4858.35,4411.04 4858.35,4399.8 4862.6,4395.55 4866.11,4395.55 4870.35,4399.8 4870.35,4411.04 4874.6,4415.28 4899.41,4415.28 v1(4908.07,4406.61)
A9: U2.26 U10.55 | length 628.4
  Top Layer w6: U10.55@4924.84,4194.8 4922.86,4196.78 4922.86,4378.97 v1(4927.52,4383.63)
  Bottom Layer w6: U2.26@4697.34,4383.78 4734.6,4383.78 4738.84,4379.54 4738.84,4368.3 4743.09,4364.05 4746.6,4364.05 4750.84,4368.3 4750.84,4379.54 4755.09,4383.78 4758.6,4383.78 4762.84,4379.54 4762.84,4368.3 4767.09,4364.05 4770.6,4364.05 4774.84,4368.3 4774.84,4379.54 4779.09,4383.78 4782.6,4383.78 4786.84,4379.54 4786.84,4368.3 4791.09,4364.05 4794.6,4364.05 4798.84,4368.3 4798.84,4379.54 4803.09,4383.78 4806.6,4383.78 4810.84,4379.54 4810.84,4368.3 4815.09,4364.05 4818.6,4364.05 4822.84,4368.3 4822.84,4379.54 4827.09,4383.78 4830.6,4383.78 4834.84,4379.54 4834.84,4368.3 4839.09,4364.05 4842.6,4364.05 4846.84,4368.3 4846.84,4379.54 4851.09,4383.78 4854.6,4383.78 4858.84,4379.54 4858.84,4368.3 4863.09,4364.05 4866.6,4364.05 4870.84,4368.3 4870.84,4379.54 4875.09,4383.78 4878.6,4383.78 4882.84,4379.54 4882.84,4368.3 4887.09,4364.05 4890.6,4364.05 4894.84,4368.3 4894.84,4379.54 4899.09,4383.78 4917.21,4383.78 4917.36,4383.63 v1(4927.52,4383.63)